# Altium PCB STM32H743I-EVAL2PCBDESIGN.PcbDoc (part 6 of 23)
Units mil, origin at the board's own origin, x right, y up, seen from the top; angles counter-clockwise.
Board outline 6558 x 5417 mil, 8 copper layers (L1_TOP, L2_GND, L3_HS1, L4_POWER, L5_SIG, L6_HS2, L7_GND, L8_BOTTOM), stack 61.368 mil thick; 620 components, 588 nets, 2945 pads, 1724 vias.
Unrouted connection lines stored in the file: 1.
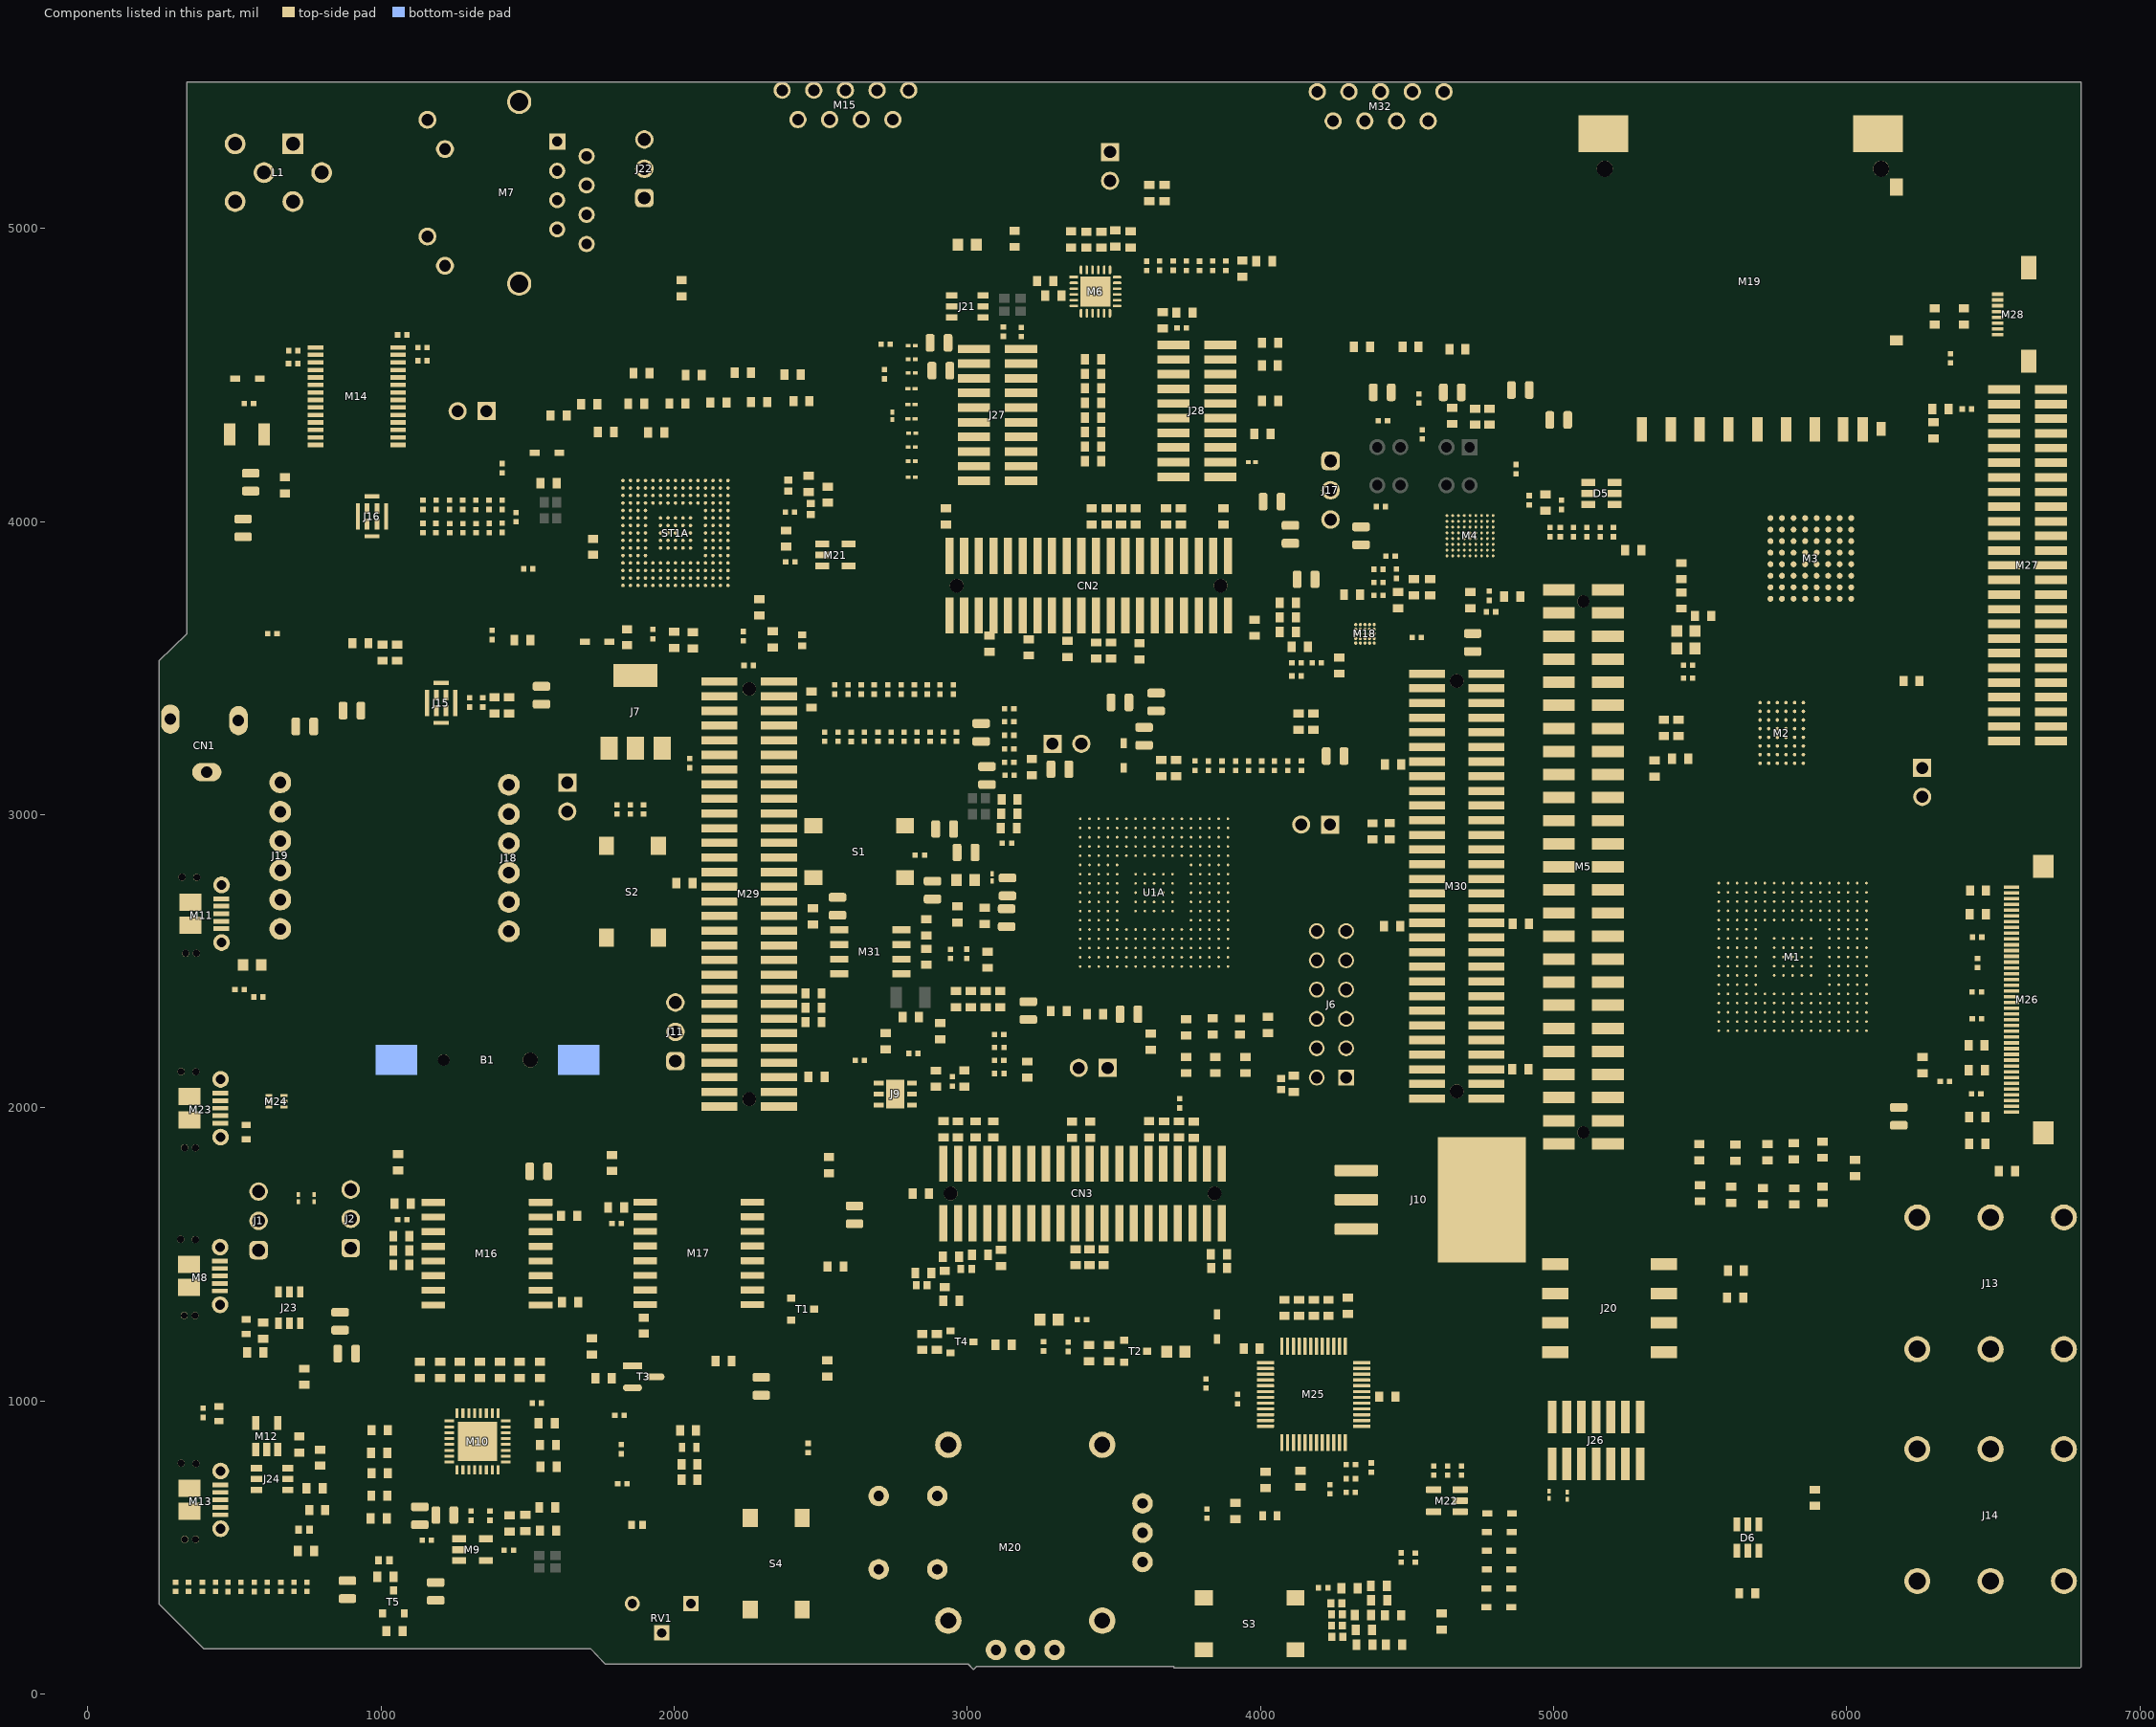
[diagram p8: the components of this part, seen from the top]

## Part data (continued)
M8 M11 M13: library part 105017-0001, "Conn Micro USB 2.0 Type B RCP 5 POS 0.65mm Solder RA SMD 5 Terminal 1 Port Micro-USB T/R", Contact Resistance=30mΩ, Current Rating=2.5A, Dielectric Material="Liquid Crystal Polymer", Insulation Color=Black, Insulation Resistance=1GΩ, Manufacturer=Molex, Manufacturer Lifecycle Status=ACTIVE, Max Operating Temperature=85°C, Max Voltage Rating (AC)=30V, Min Operating Temperature=-30°C, Supplier Part Number=WM1399CT-ND, Category="USB Connectors", China RoHS=Compliant, ComponentLink1Description=https://datasheet.octopart.com:443/1050170001-Molex-datasheet-142335147.pdf?src-supplier=IHS, ComponentLink1URL=https://datasheet.octopart.com:443/1050170001-Molex-datasheet-142335147.pdf?src-supplier=IHS, ComponentLink2Description=https://datasheet.octopart.com:443/105017-0001-Molex-datasheet-14876665.pdf?src-supplier=Upverter, ComponentLink2URL=https://datasheet.octopart.com:443/105017-0001-Molex-datasheet-14876665.pdf?src-supplier=Upverter, ComponentLink3Description=https://datasheet.octopart.com:443/105017-0001-Molex-datasheet-10100431.pdf?src-supplier=Upverter, ComponentLink3URL=https://datasheet.octopart.com:443/105017-0001-Molex-datasheet-10100431.pdf?src-supplier=Upverter, ComponentLink4Description=https://datasheet.octopart.com:443/1050170001-Molex-datasheet-8355809.pdf?src-supplier=Upverter, ComponentLink4URL=https://datasheet.octopart.com:443/1050170001-Molex-datasheet-8355809.pdf?src-supplier=Upverter, ComponentLink5Description=https://sigma.octopart.com:443/120074112/technical_drawing/Molex-1050170001.pdf?src-supplier=Upverter, ComponentLink5URL=https://sigma.octopart.com:443/120074112/technical_drawing/Molex-1050170001.pdf?src-supplier=Upverter, ComponentLink6Description=https://datasheet.octopart.com:443/105017-0001-Molex-datasheet-13746511.pdf?src-supplier=Sager+Electronics, ComponentLink6URL=https://datasheet.octopart.com:443/105017-0001-Molex-datasheet-13746511.pdf?src-supplier=Sager+Electronics, ComponentLink7Description=https://datasheet.octopart.com:443/105017-0001-Molex-datasheet-193058816.pdf?src-supplier=JRH+Electronics, ComponentLink7URL=https://datasheet.octopart.com:443/105017-0001-Molex-datasheet-193058816.pdf?src-supplier=JRH+Electronics, ComponentLink8Description=https://datasheet.octopart.com:443/105017-0001-Molex-datasheet-154742999.pdf?src-supplier=Master+Electronics, ComponentLink8URL=https://datasheet.octopart.com:443/105017-0001-Molex-datasheet-154742999.pdf?src-supplier=Master+Electronics, ComponentLink9Description=https://datasheet.octopart.com:443/105017-0001-Molex-datasheet-77519180.pdf?src-supplier=Newark, ComponentLink9URL=https://datasheet.octopart.com:443/105017-0001-Molex-datasheet-77519180.pdf?src-supplier=Newark, ComponentLink10Description=https://datasheet.octopart.com:443/105017-0001-Molex-datasheet-66628043.pdf?src-supplier=Newark, ComponentLink10URL=https://datasheet.octopart.com:443/105017-0001-Molex-datasheet-66628043.pdf?src-supplier=Newark, ComponentLink11Description=https://datasheet.octopart.com:443/105017-0001-Molex-datasheet-32867472.pdf?src-supplier=Farnell, ComponentLink11URL=https://datasheet.octopart.com:443/105017-0001-Molex-datasheet-32867472.pdf?src-supplier=Farnell, ComponentLink12Description=https://datasheet.octopart.com:443/105017-0001-Molex-datasheet-24907595.pdf?src-supplier=Farnell, ComponentLink12URL=https://datasheet.octopart.com:443/105017-0001-Molex-datasheet-24907595.pdf?src-supplier=Farnell, ComponentLink13Description=https://datasheet.octopart.com:443/105017-0001-Molex-datasheet-140174740.pdf?src-supplier=RS+(Formerly+Allied+Electronics), ComponentLink13URL=https://datasheet.octopart.com:443/105017-0001-Molex-datasheet-140174740.pdf?src-supplier=RS+(Formerly+Allied+Electronics), ComponentLink14Description=https://datasheet.octopart.com:443/105017-0001-Molex-datasheet-120135174.pdf?src-supplier=RS+(Formerly+Allied+Electronics), ComponentLink14URL=https://datasheet.octopart.com:443/105017-0001-Molex-datasheet-120135174.pdf?src-supplier=RS+(Formerly+Allied+Electronics), ComponentLink15Description=https://datasheet.octopart.com:443/1050170001-Molex-datasheet-137316104.pdf?src-supplier=Future+Electronics, ComponentLink15URL=https://datasheet.octopart.com:443/1050170001-Molex-datasheet-137316104.pdf?src-supplier=Future+Electronics, ComponentLink16Description=https://datasheet.octopart.com:443/105017-0001-Molex-datasheet-44399914.pdf?src-supplier=Electro+Sonic, ComponentLink16URL=https://datasheet.octopart.com:443/105017-0001-Molex-datasheet-44399914.pdf?src-supplier=Electro+Sonic, ComponentLink17Description=https://datasheet.octopart.com:443/105017-0001-Molex-datasheet-41578275.pdf?src-supplier=Electro+Sonic, ComponentLink17URL=https://datasheet.octopart.com:443/105017-0001-Molex-datasheet-41578275.pdf?src-supplier=Electro+Sonic, ComponentLink18Description=https://datasheet.octopart.com:443/105017-0001-Molex-datasheet-23708332.pdf?src-supplier=Electro+Sonic, ComponentLink18URL=https://datasheet.octopart.com:443/105017-0001-Molex-datasheet-23708332.pdf?src-supplier=Electro+Sonic, ComponentLink19Description=http://sigma.octopart.com:80/16324173/rohs_statement/Molex-105017-0001.pdf?src-supplier=Compliance+Statements, ComponentLink19URL=http://sigma.octopart.com:80/16324173/rohs_statement/Molex-105017-0001.pdf?src-supplier=Compliance+Statements, ComponentLink20Description=http://sigma.octopart.com:80/reach_statement/Molex-company-74.pdf?src-supplier=Compliance+Statements, ComponentLink20URL=http://sigma.octopart.com:80/reach_statement/Molex-company-74.pdf?src-supplier=Compliance+Statements, ComponentLink21Description=http://sigma.octopart.com:80/rohs_statement/Molex-company-73.pdf?src-supplier=Compliance+Statements, ComponentLink21URL=http://sigma.octopart.com:80/rohs_statement/Molex-company-73.pdf?src-supplier=Compliance+Statements, ComponentLink22Description=http://sigma.octopart.com:80/conflict_mineral_statement/Molex-company-72.pdf?src-supplier=Compliance+Statements, ComponentLink22URL=http://sigma.octopart.com:80/conflict_mineral_statement/Molex-company-72.pdf?src-supplier=Compliance+Statements, Connector Type="Receptacle, USB", Contact Material=Brass, Contact Plating=Gold, Country of Origin=US, Depth=7.5mm, Export Control Classification Number (ECCN) Code=EAR99, Features=Shielded, Gender=Female, Halogen Free="Low Halogen", Harmonized Tariff Schedule (HTS) Code=8536.69.40.30, Height=2.825mm, Housing Material=Polymer, Introduction Date=2009-06-22, Length=8.2mm, Lifecycle Status=Production, Manufacturer Part Number=105017-0001, Mounting Technology=Cable, Number of Circuits=5, Number of Contacts=5, Number of Ports=1, Number of Positions=5, Number of Rows=1, Number of Terminals=5, Orientation="Right Angle", Pins=5, Pitch=650µm, Plating=Gold, Pricing="1=0.92, 10=0.785, 25=0.7356, 50=0.7004, 100=0.667, 250=0.62516, 500=0.59532, 1000=0.56688 (USD)", Radiation Hardening=No, REACH SVHC=Yes, RoHS=Compliant, Schedule B="8536695050, 8536695050|8536695050, 8536695050|8536695050|8536695050, 8536695050|8536695050|8536695050|8536695050", Shell Finish=Tin, Shell Material="Stainless Steel", Stock=55178, Supplier=DigiKey, Terminal Pitch=650µm, Termination=Solder, USB Standard="USB 2.0", Voltage Rating=30V, Voltage Rating (AC)=30V
M9 M12 M21: "STMPS Series 1 Channel 5.5V 500 mA 200 mOhm High Side Power Switch - SOT-23-5", Ambient Temperature Range High=85°C, Case/Package=LSSOP, Current=500mA, Drain to Source Resistance=90mΩ, Manufacturer=STMicroelectronics, Max Junction Temperature (Tj)=125°C, Max Power Dissipation=33.8mW, Max Supply Current=40µA, Max Supply Voltage=5.5V, Min Input Voltage=2.7V, Min Operating Temperature=-40°C, Nominal Supply Current=12µA, Nominal Supply Voltage=5V, Power Dissipation=32.5mW, Supplier Part Number=497-6934-1-ND, Category="Power Switch ICs - Power Distribution", China RoHS=Compliant, ComponentLink1Description=https://datasheet.octopart.com:443/STMPS2151STR-STMicroelectronics-datasheet-15207125.pdf?src-supplier=ODG+(Origin+Data+Global), ComponentLink1URL=https://datasheet.octopart.com:443/STMPS2151STR-STMicroelectronics-datasheet-15207125.pdf?src-supplier=ODG+(Origin+Data+Global), ComponentLink2Description=https://datasheet.octopart.com:443/STMPS2151STR-STMicroelectronics-datasheet-8090930.pdf?src-supplier=Factory+Futures, ComponentLink2URL=https://datasheet.octopart.com:443/STMPS2151STR-STMicroelectronics-datasheet-8090930.pdf?src-supplier=Factory+Futures, ComponentLink3Description=https://datasheet.octopart.com:443/STMPS2151STR-STMicroelectronics-datasheet-12510524.pdf?src-supplier=Factory+Futures, ComponentLink3URL=https://datasheet.octopart.com:443/STMPS2151STR-STMicroelectronics-datasheet-12510524.pdf?src-supplier=Factory+Futures, ComponentLink4Description=https://datasheet.octopart.com:443/STMPS2151STR-STMicroelectronics-datasheet-502421.pdf?src-supplier=Future+Electronics, ComponentLink4URL=https://datasheet.octopart.com:443/STMPS2151STR-STMicroelectronics-datasheet-502421.pdf?src-supplier=Future+Electronics, Country of Origin=Malaysia, Current Rating=500mA, Export Control Classification Number (ECCN) Code=EAR99, Fault Protection="Over Temperature, Reverse Current", Harmonized Tariff Schedule (HTS) Code=8542.39.00.60, Height=1.45mm, Height - Seated (Max)=1.45mm, Introduction Date=2007-08-01, Lead Free="Lead Free", Length=2.9mm, Lifecycle Status=Production, Manufacturer Part Number=STMPS2151STR, Max Operating Temperature=85°C, Max Output current=500mA, Min Supply Voltage=2.7V, Mounting Technology="Surface Mount", Nominal Supply Voltage (DC)=5V, Number of Channels=1, Number of Circuits=1, Number of Inputs=1, Number of Outputs=1, Number of Terminals=5, On-State Resistance=90mΩ, Operating Supply Voltage=5.5V, Output Configuration="High Side", Output Current=500mA, Output Voltage=5V, Pins=5, Pricing="1=0.73, 10=0.517, 25=0.464, 100=0.406, 250=0.37836, 500=0.36168, 1000=0.34794 (USD)", Radiation Hardening=No, REACH SVHC=Yes, RoHS=Compliant, Schedule B=8542390000, Supplier=DigiKey, Terminal Pitch=950µm, Turn-Off Delay Time=10ms, Turn-On Delay Time=5ms, Voltage=5.5V, Width=1.625mm
M10: "Microchip USB3320C-EZK; USB Transceiver; USB 2.0 at 480Mbit/s; 32-Pin QFN", Dual Supply Voltage=3.3V, Frequency=60MHz, Manufacturer=Microchip, Manufacturer Lifecycle Status=REL, Max Operating Temperature=85°C, Max Supply Voltage=2V, Min Operating Temperature=-40°C, Min Supply Voltage=1.6V, Nominal Supply Current=5.6mA, Supplier Part Number=USB3320C-EZK-ND, Category="USB Interface ICs", ComponentLink1Description=https://datasheet.octopart.com:443/USB3320C-EZK-Microchip-datasheet-78862040.pdf?src-supplier=Microchip, ComponentLink1URL=https://datasheet.octopart.com:443/USB3320C-EZK-Microchip-datasheet-78862040.pdf?src-supplier=Microchip, ComponentLink2Description=https://datasheet.octopart.com:443/USB3320C-EZK-Microchip-datasheet-179437581.pdf?src-supplier=Microchip, ComponentLink2URL=https://datasheet.octopart.com:443/USB3320C-EZK-Microchip-datasheet-179437581.pdf?src-supplier=Microchip, ComponentLink3Description=https://datasheet.octopart.com:443/USB3320C-EZK-Microchip-datasheet-175859481.pdf?src-supplier=Microchip, ComponentLink3URL=https://datasheet.octopart.com:443/USB3320C-EZK-Microchip-datasheet-175859481.pdf?src-supplier=Microchip, ComponentLink4Description=https://datasheet.octopart.com:443/USB3320C-EZK-Microchip-datasheet-11971509.pdf?src-supplier=Arrow+Electronics, ComponentLink4URL=https://datasheet.octopart.com:443/USB3320C-EZK-Microchip-datasheet-11971509.pdf?src-supplier=Arrow+Electronics, ComponentLink5Description=https://datasheet.octopart.com:443/USB3320C-EZK-Microchip-datasheet-44328528.pdf?src-supplier=element14+APAC, ComponentLink5URL=https://datasheet.octopart.com:443/USB3320C-EZK-Microchip-datasheet-44328528.pdf?src-supplier=element14+APAC, ComponentLink6Description=https://datasheet.octopart.com:443/USB3320C-EZK-Microchip-datasheet-62308171.pdf?src-supplier=RS+(Formerly+Allied+Electronics), ComponentLink6URL=https://datasheet.octopart.com:443/USB3320C-EZK-Microchip-datasheet-62308171.pdf?src-supplier=RS+(Formerly+Allied+Electronics), ComponentLink7Description=http://sigma.octopart.com:80/188451864/materials_sheet/Microchip-USB3320C-EZK.pdf?src-supplier=Compliance+Statements, ComponentLink7URL=http://sigma.octopart.com:80/188451864/materials_sheet/Microchip-USB3320C-EZK.pdf?src-supplier=Compliance+Statements, ComponentLink8Description=http://sigma.octopart.com:80/rohs_statement/Microchip-company-71.pdf?src-supplier=Compliance+Statements, ComponentLink8URL=http://sigma.octopart.com:80/rohs_statement/Microchip-company-71.pdf?src-supplier=Compliance+Statements, ComponentLink9Description=http://sigma.octopart.com:80/reach_statement/Microchip-company-70.pdf?src-supplier=Compliance+Statements, ComponentLink9URL=http://sigma.octopart.com:80/reach_statement/Microchip-company-70.pdf?src-supplier=Compliance+Statements, ComponentLink10Description=http://sigma.octopart.com:80/conflict_mineral_statement/Microchip-company-69.pdf?src-supplier=Compliance+Statements, ComponentLink10URL=http://sigma.octopart.com:80/conflict_mineral_statement/Microchip-company-69.pdf?src-supplier=Compliance+Statements, ComponentLink11Description=http://sigma.octopart.com:80/conflict_mineral_statement/Microchip-company-68.pdf?src-supplier=Compliance+Statements, ComponentLink11URL=http://sigma.octopart.com:80/conflict_mineral_statement/Microchip-company-68.pdf?src-supplier=Compliance+Statements, Country of Assembly="Singapore, Taiwan", Country of Fabrication="United States of America", Country of Origin="Singapore, Taiwan", Data Rate=480Mbps, ESD Protection=Yes, Export Control Classification Number (ECCN) Code=EAR99, Harmonized Tariff Schedule (HTS) Code=8542.31.0030, Height=900µm, HS Code=8542.39.0090, Lead Free="Lead Free", Length=5mm, Lifecycle Status=Production, Manufacturer Part Number=USB3320C-EZK, Mounting Technology="Surface Mount", Number of Ports=1, Number of Transceivers=1, Operating Supply Current=5.6mA, Operating Supply Voltage=3.3V, Packaging="Cut Tape", Pins=32, Pricing="1=2.17, 25=1.8, 100=1.65 (USD)", Projected EOL Date=2034-06-12, Radiation Hardening=No, REACH SVHC=No, RoHS=Compliant, Schedule B="8542310000, 8542310000|8542310000|8542310000|8542310000|8542310000", Stock=28177, Supplier=DigiKey, Width=5mm
M14: "3 to 5.5V 400KBPS, RS-232 Transceiver With Auto-powerdown, [-40OC, 85OC] Temperature Range", Case/Package=SSOP, Dual Supply Voltage=5.5V, Low Level Output Current=1.6mA, Manufacturer=STMicroelectronics, Max Operating Temperature=85°C, Max Supply Current=1mA, Min Operating Temperature=-40°C, Min Supply Voltage=3V, Nominal Supply Voltage (DC)=3.3V, Supplier Part Number=497-6997-6-ND, Temperature Grade=Industrial, Category="Interface ICs", China RoHS=Compliant, ComponentLink1Description=https://datasheet.octopart.com:443/ST3241EBPR-STMicroelectronics-datasheet-10836365.pdf?src-supplier=Factory+Futures, ComponentLink1URL=https://datasheet.octopart.com:443/ST3241EBPR-STMicroelectronics-datasheet-10836365.pdf?src-supplier=Factory+Futures, ComponentLink2Description=https://datasheet.octopart.com:443/ST3241EBPR-STMicroelectronics-datasheet-23757367.pdf?src-supplier=STMicroelectronics, ComponentLink2URL=https://datasheet.octopart.com:443/ST3241EBPR-STMicroelectronics-datasheet-23757367.pdf?src-supplier=STMicroelectronics, ComponentLink3Description=https://datasheet.octopart.com:443/ST3241EBPR-STMicroelectronics-datasheet-112248627.pdf?src-supplier=SHENGYU+ELECTRONICS, ComponentLink3URL=https://datasheet.octopart.com:443/ST3241EBPR-STMicroelectronics-datasheet-112248627.pdf?src-supplier=SHENGYU+ELECTRONICS, ComponentLink4Description=https://datasheet.octopart.com:443/ST3241EBPR-STMicroelectronics-datasheet-14128491.pdf?src-supplier=iiiC, ComponentLink4URL=https://datasheet.octopart.com:443/ST3241EBPR-STMicroelectronics-datasheet-14128491.pdf?src-supplier=iiiC, ComponentLink5Description=https://datasheet.octopart.com:443/ST3241EBPR-STMicroelectronics-datasheet-558575.pdf?src-supplier=Future+Electronics, ComponentLink5URL=https://datasheet.octopart.com:443/ST3241EBPR-STMicroelectronics-datasheet-558575.pdf?src-supplier=Future+Electronics, ComponentLink6Description=https://datasheet.octopart.com:443/ST3241EBPR-STMicroelectronics-datasheet-29427.pdf?src-supplier=Mouser, ComponentLink6URL=https://datasheet.octopart.com:443/ST3241EBPR-STMicroelectronics-datasheet-29427.pdf?src-supplier=Mouser, Country of Origin=Philippines, Data Rate=250kbps, Export Control Classification Number (ECCN) Code=EAR99, Harmonized Tariff Schedule (HTS) Code=8542.39.00.60, Height=1.85mm, Height - Seated (Max)=2mm, Interface=RS-232, Introduction Date=1980-01-04, Lead Free="Lead Free", Length=10.2mm, Lifecycle Status=Production, Logic Function=Receiver, Manufacturer Part Number=ST3241EBPR, Max Supply Voltage=5.5V, Mounting Technology="Surface Mount", Nominal Supply Current=1mA, Number of Circuits=3, Number of Drivers=3, Number of Receivers=5, Number of Terminals=28, Number of Transceivers=1, Number of Transmitters=3, Pins=28, Pricing="1=3.89, 10=2.935, 25=2.696, 100=2.4333, 250=2.30808, 500=2.29132 (USD)", Radiation Hardening=No, REACH SVHC=No, RoHS=Compliant, Schedule B="8542390000, 8542390000|8542390000|8542390000|8542390000|8542390000", Stock=315, Supplier=DigiKey, Terminal Pitch=650µm, Width=5.3mm
M15 M32: "D Subminiature Connector, 9 Contact(s), Female, 2.84 inch Pitch, Solder Terminal, #4-40 Unc-2b", Color=White, Current Rating=7.5A, Manufacturer=Molex, Manufacturer Lifecycle Status=ACTIVE, Max Operating Temperature=125°C, Min Operating Temperature=-55°C, Supplier Part Number=900-1731090181-ND, Category="D-Sub Connectors", China RoHS=Compliant, ComponentLink1Description=https://datasheet.octopart.com:443/1731090181-Molex-datasheet-147937146.pdf?src-supplier=IHS, ComponentLink1URL=https://datasheet.octopart.com:443/1731090181-Molex-datasheet-147937146.pdf?src-supplier=IHS, ComponentLink2Description=http://sigma.octopart.com:80/reach_statement/Molex-company-74.pdf?src-supplier=Compliance+Statements, ComponentLink2URL=http://sigma.octopart.com:80/reach_statement/Molex-company-74.pdf?src-supplier=Compliance+Statements, ComponentLink3Description=http://sigma.octopart.com:80/rohs_statement/Molex-company-73.pdf?src-supplier=Compliance+Statements, ComponentLink3URL=http://sigma.octopart.com:80/rohs_statement/Molex-company-73.pdf?src-supplier=Compliance+Statements, ComponentLink4Description=http://sigma.octopart.com:80/conflict_mineral_statement/Molex-company-72.pdf?src-supplier=Compliance+Statements, ComponentLink4URL=http://sigma.octopart.com:80/conflict_mineral_statement/Molex-company-72.pdf?src-supplier=Compliance+Statements, Connector Type=D-Sub, Contact Plating=Gold, Country of Origin=DE, Export Control Classification Number (ECCN) Code=EAR99, Gender=Female, Harmonized Tariff Schedule (HTS) Code=8536.69.40.30, Housing Material=Steel, Insulation Color=White, Introduction Date=2019-07-25, Lifecycle Status=Production, Manufacturer Part Number=173109-0181, Mounting Technology="Through Hole", Number of Circuits=9, Number of Positions=9, Number of Rows=2, Orientation="Right Angle", Packaging=Carton, Pins=9, Pitch=72.136mm, Pricing="1=9.9, 10=8.414, 25=7.8872, 50=7.5106, 100=7.1521, 250=6.70452, 500=6.38476, 1000=6.08037 (USD)", REACH SVHC=Unknown, RoHS=Compliant, Row Spacing=2.54mm, Shell Finish=Tin, Shell Material=Steel, Supplier=DigiKey, Terminal Pitch=2.74mm, Termination=Solder
M16: "SPIFLASHNORSLC128MX4SOIC, Tray, Flash IC; SPIFLASHNORSLC128MX4SOIC, Tray, Flash IC", Ambient Temperature Range High=85°C, Case/Package=SOP, Frequency=133MHz, Manufacturer=Micron, Max Supply Current=94mA, Max Supply Voltage=3.6V, Min Operating Temperature=-40°C, Min Supply Voltage=2.7V, Nominal Supply Voltage (DC)=3V, Supplier Part Number=557-1651-ND, Temperature Grade=Industrial, Access Time=6ns, Category=Flash, China RoHS=Compliant, ComponentLink1Description=https://datasheet.octopart.com:443/MT25QL512ABB8ESF-0SIT-Micron-datasheet-103814521.pdf?src-supplier=Farnell, ComponentLink1URL=https://datasheet.octopart.com:443/MT25QL512ABB8ESF-0SIT-Micron-datasheet-103814521.pdf?src-supplier=Farnell, ComponentLink2Description=https://sigma.octopart.com:443/129378302/technical_drawing/Micron-MT25QL512ABB8ESF-0SIT.pdf?src-supplier=Upverter, ComponentLink2URL=https://sigma.octopart.com:443/129378302/technical_drawing/Micron-MT25QL512ABB8ESF-0SIT.pdf?src-supplier=Upverter, ComponentLink3Description=https://datasheet.octopart.com:443/MT25QL512ABB8ESF-0SIT-Micron-datasheet-163656713.pdf?src-supplier=SHENGYU+ELECTRONICS, ComponentLink3URL=https://datasheet.octopart.com:443/MT25QL512ABB8ESF-0SIT-Micron-datasheet-163656713.pdf?src-supplier=SHENGYU+ELECTRONICS, Country of Origin="Mainland China, Taiwan", Density=512Mb, Export Control Classification Number (ECCN) Code=EAR99, Harmonized Tariff Schedule (HTS) Code=8542.32.00.51, Height=2.65mm, Height - Seated (Max)=2.65mm, Interface=SPI, Introduction Date=2015-06-04, Length=10.3mm, Lifecycle Status=Production, Manufacturer Part Number=MT25QL512ABB8ESF-0SIT, Max Operating Temperature=85°C, Memory Format=FLASH, Memory Size=64MB, Mounting Technology="Surface Mount", Number of Circuits=1, Number of Terminals=16, Operating Supply Voltage=3V, Page Size=256B, Pins=16, Pricing="1=44.89, 10=41.511, 25=40.1748, 50=39.1762, 100=38.1909, 250=36.9146 (USD)", REACH SVHC=Yes, RoHS=Compliant, Schedule B="8542320050, 8542320050|8542320050, 8542320050|8542320050|8542320050, 8542320050|8542320050|8542320050|8542320050", Stock=1400, Supplier=DigiKey, Terminal Pitch=1.27mm, Width=7.5mm
M17: "SPIFLASHNORSLC128MX4SOIC, Tray, Flash IC; SPIFLASHNORSLC128MX4SOIC, Tray, Flash IC", Ambient Temperature Range High=85°C, Case/Package=SOP, Frequency=133MHz, Manufacturer=Micron, Manufacturer Part Number=MT25QL512ABB8ESF-0SIT, Max Supply Current=94mA, Max Supply Voltage=3.6V, Min Operating Temperature=-40°C, Min Supply Voltage=2.7V, Nominal Supply Voltage (DC)=3V, Supplier Part Number=557-1651-ND, Temperature Grade=Industrial, Access Time=6ns, Category=Flash, China RoHS=Compliant, ComponentLink1Description=https://datasheet.octopart.com:443/MT25QL512ABB8ESF-0SIT-Micron-datasheet-103814521.pdf?src-supplier=Farnell, ComponentLink1URL=https://datasheet.octopart.com:443/MT25QL512ABB8ESF-0SIT-Micron-datasheet-103814521.pdf?src-supplier=Farnell, ComponentLink2Description=https://sigma.octopart.com:443/129378302/technical_drawing/Micron-MT25QL512ABB8ESF-0SIT.pdf?src-supplier=Upverter, ComponentLink2URL=https://sigma.octopart.com:443/129378302/technical_drawing/Micron-MT25QL512ABB8ESF-0SIT.pdf?src-supplier=Upverter, ComponentLink3Description=https://datasheet.octopart.com:443/MT25QL512ABB8ESF-0SIT-Micron-datasheet-163656713.pdf?src-supplier=SHENGYU+ELECTRONICS, ComponentLink3URL=https://datasheet.octopart.com:443/MT25QL512ABB8ESF-0SIT-Micron-datasheet-163656713.pdf?src-supplier=SHENGYU+ELECTRONICS, Country of Origin="Mainland China, Taiwan", Density=512Mb, Export Control Classification Number (ECCN) Code=EAR99, Harmonized Tariff Schedule (HTS) Code=8542.32.00.51, Height=2.65mm, Height - Seated (Max)=2.65mm, Interface=SPI, Introduction Date=2015-06-04, Length=10.3mm, Lifecycle Status=Production, Max Operating Temperature=85°C, Memory Format=FLASH, Memory Size=64MB, Mounting Technology="Surface Mount", Number of Circuits=1, Number of Terminals=16, Operating Supply Voltage=3V, Page Size=256B, Pins=16, Pricing="1=44.89, 10=41.511, 25=40.1748, 50=39.1762, 100=38.1909, 250=36.9146 (USD)", REACH SVHC=Yes, RoHS=Compliant, Schedule B="8542320050, 8542320050|8542320050, 8542320050|8542320050|8542320050, 8542320050|8542320050|8542320050|8542320050", Stock=1400, Supplier=DigiKey, Terminal Pitch=1.27mm, Width=7.5mm
M18: "IC INTFACE SPECIALIZED 25WLCSP"
M19: "SD CARD CONNECTOR EMBOSS ASSY Secure Digital (Sd) Card", Color=Black, Contact Current Rating=500mA, Dielectric Material="Liquid Crystal Polymer", Flammability Rating="UL94 V-0", Manufacturer="TE Connectivity", Manufacturer Lifecycle Status=ACTIVE, Max Operating Temperature=85°C, Min Operating Temperature=-25°C, Supplier Part Number=A118090CT-ND, Category="Card Edge Connectors", China RoHS=Compliant, Circuit Application=Signal, ComponentLink1Description=https://datasheet.octopart.com:443/1939870-1-TE-Connectivity-datasheet-179975926.pdf?src-supplier=Farnell, ComponentLink1URL=https://datasheet.octopart.com:443/1939870-1-TE-Connectivity-datasheet-179975926.pdf?src-supplier=Farnell, ComponentLink2Description=https://datasheet.octopart.com:443/1939870-1-TE-Connectivity-datasheet-179975927.pdf?src-supplier=Farnell, ComponentLink2URL=https://datasheet.octopart.com:443/1939870-1-TE-Connectivity-datasheet-179975927.pdf?src-supplier=Farnell, ComponentLink3Description=https://sigma.octopart.com:443/49791557/technical_drawing/TE-Connectivity-1939870-1.pdf?src-supplier=ODG+(Origin+Data+Global), ComponentLink3URL=https://sigma.octopart.com:443/49791557/technical_drawing/TE-Connectivity-1939870-1.pdf?src-supplier=ODG+(Origin+Data+Global), ComponentLink4Description=https://datasheet.octopart.com:443/1939870-1-TE-Connectivity---AMP-datasheet-193266114.pdf?src-supplier=JRH+Electronics, ComponentLink4URL=https://datasheet.octopart.com:443/1939870-1-TE-Connectivity---AMP-datasheet-193266114.pdf?src-supplier=JRH+Electronics, ComponentLink5Description=https://sigma.octopart.com:443/14898149/technical_drawing/TE-Connectivity-1939870-1.pdf?src-supplier=TE+Connectivity, ComponentLink5URL=https://sigma.octopart.com:443/14898149/technical_drawing/TE-Connectivity-1939870-1.pdf?src-supplier=TE+Connectivity, ComponentLink6Description=https://datasheet.octopart.com:443/1939870-1-TE-Connectivity---AMP-datasheet-154801044.pdf?src-supplier=Master+Electronics, ComponentLink6URL=https://datasheet.octopart.com:443/1939870-1-TE-Connectivity---AMP-datasheet-154801044.pdf?src-supplier=Master+Electronics, ComponentLink7Description=https://datasheet.octopart.com:443/1939870-1-TE-Connectivity-datasheet-166228420.pdf?src-supplier=RS+(Formerly+Allied+Electronics), ComponentLink7URL=https://datasheet.octopart.com:443/1939870-1-TE-Connectivity-datasheet-166228420.pdf?src-supplier=RS+(Formerly+Allied+Electronics), ComponentLink8Description=http://sigma.octopart.com:80/38577613/materials_sheet/TE-Connectivity-1939870-1.pdf?src-supplier=Compliance+Statements, ComponentLink8URL=http://sigma.octopart.com:80/38577613/materials_sheet/TE-Connectivity-1939870-1.pdf?src-supplier=Compliance+Statements, ComponentLink9Description=http://sigma.octopart.com:80/14898148/rohs_certificate/TE-Connectivity---AMP-1939870-1.pdf?src-supplier=Compliance+Statements, ComponentLink9URL=http://sigma.octopart.com:80/14898148/rohs_certificate/TE-Connectivity---AMP-1939870-1.pdf?src-supplier=Compliance+Statements, Contact Plating="Gold, Tin", Current Rating=500mA, ELV=Compliant, Export Control Classification Number (ECCN) Code=EAR99, Gender=Male, Harmonized Tariff Schedule (HTS) Code=8536.69.40.40, Housing Color=Black, Housing Material=Thermoplastic, Insulation Color=Black, Introduction Date=2009-06-29, Lifecycle Status=Production, LTB Date=2026-11-28, Manufacturer Part Number=1939870-1, Mounting Technology="Surface Mount", Number of Contacts=9, Number of Ports=1, Number of Positions=9, Number of Rows=1, Orientation="Right Angle", Packaging="Tape & Reel", Pins=9, Pitch=2.4mm, Plating Thickness=500nm, Pricing="1=5.36, 10=4.553, 25=4.2672, 50=4.0634 (USD)", Radiation Hardening=No, REACH SVHC=Yes, RoHS=Compliant, Shielding=Unshielded, Stock=7302, Supplier=DigiKey, Terminal Pitch=1.7mm, Termination=Solder, Underplate Material=Nickel
M20: "Switch Joystick Analog", Manufacturer=SparkFun, Supplier Part Number=1568-09032-ND, Category=Uncategorized, Manufacturer Part Number=09032, Pricing="1=5.25 (USD)", Stock=1640, Supplier=DigiKey
M22: "LD3985 Series 150 mA 3.3 V Fixed Low Noise LDO BiCMOS Regulator-SOT-23-5", Case/Package=LSSOP, Dropout Voltage=60mV, Input Bias Current=85µA, Manufacturer=STMicroelectronics, Max Junction Temperature (Tj)=125°C, Max Output current=150mA, Max Supply Voltage=6V, Min Current Limit=300mA, Min Input Voltage=2.5V, Min Operating Temperature=-40°C, Min Output Voltage=3.3V, Output Voltage Accuracy=2%, Quiescent Current=150µA, Supplier Part Number=497-3504-1-ND, Voltage Tolerance=3%, Accuracy=2%, Category="LDO Voltage Regulators", China RoHS=Compliant, ComponentLink1Description=https://datasheet.octopart.com:443/LD3985M33R-STMicroelectronics-datasheet-10835804.pdf?src-supplier=element14+APAC, ComponentLink1URL=https://datasheet.octopart.com:443/LD3985M33R-STMicroelectronics-datasheet-10835804.pdf?src-supplier=element14+APAC, ComponentLink2Description=https://datasheet.octopart.com:443/LD3985M33R-STMicroelectronics-datasheet-62333366.pdf?src-supplier=Augswan, ComponentLink2URL=https://datasheet.octopart.com:443/LD3985M33R-STMicroelectronics-datasheet-62333366.pdf?src-supplier=Augswan, ComponentLink3Description=https://datasheet.octopart.com:443/LD3985M33R-STMicroelectronics-datasheet-164563980.pdf?src-supplier=TME, ComponentLink3URL=https://datasheet.octopart.com:443/LD3985M33R-STMicroelectronics-datasheet-164563980.pdf?src-supplier=TME, ComponentLink4Description=https://datasheet.octopart.com:443/LD3985M33R-STMicroelectronics-datasheet-104525728.pdf?src-supplier=Future+Electronics, ComponentLink4URL=https://datasheet.octopart.com:443/LD3985M33R-STMicroelectronics-datasheet-104525728.pdf?src-supplier=Future+Electronics, ComponentLink5Description=https://datasheet.octopart.com:443/LD3985M33R-STMicroelectronics-datasheet-14170001.pdf?src-supplier=iiiC, ComponentLink5URL=https://datasheet.octopart.com:443/LD3985M33R-STMicroelectronics-datasheet-14170001.pdf?src-supplier=iiiC, ComponentLink6Description=https://datasheet.octopart.com:443/LD3985M33R-STMicroelectronics-datasheet-27122505.pdf?src-supplier=Components+Direct, ComponentLink6URL=https://datasheet.octopart.com:443/LD3985M33R-STMicroelectronics-datasheet-27122505.pdf?src-supplier=Components+Direct, ComponentLink7Description=https://datasheet.octopart.com:443/LD3985M33R-STMicroelectronics-datasheet-29224.pdf?src-supplier=DigiKey, ComponentLink7URL=https://datasheet.octopart.com:443/LD3985M33R-STMicroelectronics-datasheet-29224.pdf?src-supplier=DigiKey, Country of Origin="Mainland China", Export Control Classification Number (ECCN) Code=EAR99, Harmonized Tariff Schedule (HTS) Code=8542.39.00.60, Height=1.45mm, Height - Seated (Max)=1.45mm, Introduction Date=1980-01-04, Lead Free="Lead Free", Length=2.9mm, Lifecycle Status=Production, Manufacturer Part Number=LD3985M33R, Max Operating Temperature=125°C, Min Supply Voltage=2.5V, Mounting Technology="Surface Mount", Number of Channels=1, Number of Circuits=1, Number of Outputs=1, Number of Regulators=1, Number of Terminals=5, Output Current=150mA, Output Type=Fixed, Output Voltage=3.3V, Pins=5, Polarity=Positive, Pricing="1=0.78, 10=0.552, 25=0.4964, 100=0.435, 250=0.40568, 500=0.388, 1000=0.37345 (USD)", Radiation Hardening=No, REACH SVHC=Yes, RoHS=Compliant, Schedule B="8542390000, 8542390000|8542390000, 8542390000|8542390000|8542390000, 8542390000|8542390000|8542390000|8542390000", Stock=15691, Supplier=DigiKey, Terminal Pitch=950µm, Width=1.625mm
M23: "Conn Micro USB 2.0 Type B RCP 5 POS 0.65mm Solder RA SMD 5 Terminal 1 Port Micro-USB T/R", Contact Resistance=30mΩ, Current Rating=2.5A, Dielectric Material="Liquid Crystal Polymer", Insulation Color=Black, Insulation Resistance=1GΩ, Manufacturer=Molex, Manufacturer Lifecycle Status=ACTIVE, Manufacturer Part Number=105017-0001, Max Operating Temperature=85°C, Max Voltage Rating (AC)=30V, Min Operating Temperature=-30°C, Supplier Part Number=WM1399CT-ND, Category="USB Connectors", China RoHS=Compliant, ComponentLink1Description=https://datasheet.octopart.com:443/1050170001-Molex-datasheet-142335147.pdf?src-supplier=IHS, ComponentLink1URL=https://datasheet.octopart.com:443/1050170001-Molex-datasheet-142335147.pdf?src-supplier=IHS, ComponentLink2Description=https://datasheet.octopart.com:443/105017-0001-Molex-datasheet-14876665.pdf?src-supplier=Upverter, ComponentLink2URL=https://datasheet.octopart.com:443/105017-0001-Molex-datasheet-14876665.pdf?src-supplier=Upverter, ComponentLink3Description=https://datasheet.octopart.com:443/105017-0001-Molex-datasheet-10100431.pdf?src-supplier=Upverter, ComponentLink3URL=https://datasheet.octopart.com:443/105017-0001-Molex-datasheet-10100431.pdf?src-supplier=Upverter, ComponentLink4Description=https://datasheet.octopart.com:443/1050170001-Molex-datasheet-8355809.pdf?src-supplier=Upverter, ComponentLink4URL=https://datasheet.octopart.com:443/1050170001-Molex-datasheet-8355809.pdf?src-supplier=Upverter, ComponentLink5Description=https://sigma.octopart.com:443/120074112/technical_drawing/Molex-1050170001.pdf?src-supplier=Upverter, ComponentLink5URL=https://sigma.octopart.com:443/120074112/technical_drawing/Molex-1050170001.pdf?src-supplier=Upverter, ComponentLink6Description=https://datasheet.octopart.com:443/105017-0001-Molex-datasheet-13746511.pdf?src-supplier=Sager+Electronics, ComponentLink6URL=https://datasheet.octopart.com:443/105017-0001-Molex-datasheet-13746511.pdf?src-supplier=Sager+Electronics, ComponentLink7Description=https://datasheet.octopart.com:443/105017-0001-Molex-datasheet-193058816.pdf?src-supplier=JRH+Electronics, ComponentLink7URL=https://datasheet.octopart.com:443/105017-0001-Molex-datasheet-193058816.pdf?src-supplier=JRH+Electronics, ComponentLink8Description=https://datasheet.octopart.com:443/105017-0001-Molex-datasheet-154742999.pdf?src-supplier=Master+Electronics, ComponentLink8URL=https://datasheet.octopart.com:443/105017-0001-Molex-datasheet-154742999.pdf?src-supplier=Master+Electronics, ComponentLink9Description=https://datasheet.octopart.com:443/105017-0001-Molex-datasheet-77519180.pdf?src-supplier=Newark, ComponentLink9URL=https://datasheet.octopart.com:443/105017-0001-Molex-datasheet-77519180.pdf?src-supplier=Newark, ComponentLink10Description=https://datasheet.octopart.com:443/105017-0001-Molex-datasheet-66628043.pdf?src-supplier=Newark, ComponentLink10URL=https://datasheet.octopart.com:443/105017-0001-Molex-datasheet-66628043.pdf?src-supplier=Newark, ComponentLink11Description=https://datasheet.octopart.com:443/105017-0001-Molex-datasheet-32867472.pdf?src-supplier=Farnell, ComponentLink11URL=https://datasheet.octopart.com:443/105017-0001-Molex-datasheet-32867472.pdf?src-supplier=Farnell, ComponentLink12Description=https://datasheet.octopart.com:443/105017-0001-Molex-datasheet-24907595.pdf?src-supplier=Farnell, ComponentLink12URL=https://datasheet.octopart.com:443/105017-0001-Molex-datasheet-24907595.pdf?src-supplier=Farnell, ComponentLink13Description=https://datasheet.octopart.com:443/105017-0001-Molex-datasheet-140174740.pdf?src-supplier=RS+(Formerly+Allied+Electronics), ComponentLink13URL=https://datasheet.octopart.com:443/105017-0001-Molex-datasheet-140174740.pdf?src-supplier=RS+(Formerly+Allied+Electronics), ComponentLink14Description=https://datasheet.octopart.com:443/105017-0001-Molex-datasheet-120135174.pdf?src-supplier=RS+(Formerly+Allied+Electronics), ComponentLink14URL=https://datasheet.octopart.com:443/105017-0001-Molex-datasheet-120135174.pdf?src-supplier=RS+(Formerly+Allied+Electronics), ComponentLink15Description=https://datasheet.octopart.com:443/1050170001-Molex-datasheet-137316104.pdf?src-supplier=Future+Electronics, ComponentLink15URL=https://datasheet.octopart.com:443/1050170001-Molex-datasheet-137316104.pdf?src-supplier=Future+Electronics, ComponentLink16Description=https://datasheet.octopart.com:443/105017-0001-Molex-datasheet-44399914.pdf?src-supplier=Electro+Sonic, ComponentLink16URL=https://datasheet.octopart.com:443/105017-0001-Molex-datasheet-44399914.pdf?src-supplier=Electro+Sonic, ComponentLink17Description=https://datasheet.octopart.com:443/105017-0001-Molex-datasheet-41578275.pdf?src-supplier=Electro+Sonic, ComponentLink17URL=https://datasheet.octopart.com:443/105017-0001-Molex-datasheet-41578275.pdf?src-supplier=Electro+Sonic, ComponentLink18Description=https://datasheet.octopart.com:443/105017-0001-Molex-datasheet-23708332.pdf?src-supplier=Electro+Sonic, ComponentLink18URL=https://datasheet.octopart.com:443/105017-0001-Molex-datasheet-23708332.pdf?src-supplier=Electro+Sonic, ComponentLink19Description=http://sigma.octopart.com:80/16324173/rohs_statement/Molex-105017-0001.pdf?src-supplier=Compliance+Statements, ComponentLink19URL=http://sigma.octopart.com:80/16324173/rohs_statement/Molex-105017-0001.pdf?src-supplier=Compliance+Statements, ComponentLink20Description=http://sigma.octopart.com:80/reach_statement/Molex-company-74.pdf?src-supplier=Compliance+Statements, ComponentLink20URL=http://sigma.octopart.com:80/reach_statement/Molex-company-74.pdf?src-supplier=Compliance+Statements, ComponentLink21Description=http://sigma.octopart.com:80/rohs_statement/Molex-company-73.pdf?src-supplier=Compliance+Statements, ComponentLink21URL=http://sigma.octopart.com:80/rohs_statement/Molex-company-73.pdf?src-supplier=Compliance+Statements, ComponentLink22Description=http://sigma.octopart.com:80/conflict_mineral_statement/Molex-company-72.pdf?src-supplier=Compliance+Statements, ComponentLink22URL=http://sigma.octopart.com:80/conflict_mineral_statement/Molex-company-72.pdf?src-supplier=Compliance+Statements, Connector Type="Receptacle, USB", Contact Material=Brass, Contact Plating=Gold, Country of Origin=US, Depth=7.5mm, Export Control Classification Number (ECCN) Code=EAR99, Features=Shielded, Gender=Female, Halogen Free="Low Halogen", Harmonized Tariff Schedule (HTS) Code=8536.69.40.30, Height=2.825mm, Housing Material=Polymer, Introduction Date=2009-06-22, Length=8.2mm, Lifecycle Status=Production, Mounting Technology=Cable, Number of Circuits=5, Number of Contacts=5, Number of Ports=1, Number of Positions=5, Number of Rows=1, Number of Terminals=5, Orientation="Right Angle", Pins=5, Pitch=650µm, Plating=Gold, Pricing="1=0.92, 10=0.785, 25=0.7356, 50=0.7004, 100=0.667, 250=0.62516, 500=0.59532, 1000=0.56688 (USD)", Radiation Hardening=No, REACH SVHC=Yes, RoHS=Compliant, Schedule B="8536695050, 8536695050|8536695050, 8536695050|8536695050|8536695050, 8536695050|8536695050|8536695050|8536695050", Shell Finish=Tin, Shell Material="Stainless Steel", Stock=55176, Supplier=DigiKey, Terminal Pitch=650µm, Termination=Solder, USB Standard="USB 2.0", Voltage Rating=30V, Voltage Rating (AC)=30V
M24: "ECMF02 Series 200 mA 2.5 Ohm Common Mode Filter with ESD Protection - UQFN-6", Attenuation Value=-34dB, Case/Package=QFN, Current=200mA, DC Resistance (DCR)=2.5Ω, Manufacturer=STMicroelectronics, Max Junction Temperature (Tj)=125°C, Max Operating Temperature=85°C, Min Breakdown Voltage=6V, Min Operating Temperature=-40°C, Supplier Part Number=497-10773-2-ND, Approvals="IEC, UL", Bandwidth=6GHz, Category="EMI / RFI Filters", China RoHS=Compliant, ComponentLink1Description=https://datasheet.octopart.com:443/ECMF02-2AMX6-STMicroelectronics-datasheet-10838395.pdf?src-supplier=Factory+Futures, ComponentLink1URL=https://datasheet.octopart.com:443/ECMF02-2AMX6-STMicroelectronics-datasheet-10838395.pdf?src-supplier=Factory+Futures, ComponentLink2Description=https://datasheet.octopart.com:443/ECMF02-2AMX6-STMicroelectronics-datasheet-103922664.pdf?src-supplier=TME, ComponentLink2URL=https://datasheet.octopart.com:443/ECMF02-2AMX6-STMicroelectronics-datasheet-103922664.pdf?src-supplier=TME, Country of Origin="Mainland China", Current Rating=200mA, Depth=1.55mm, ESR=2.5Ω, Export Control Classification Number (ECCN) Code=EAR99, Harmonized Tariff Schedule (HTS) Code=8504.50.80.00, Height=550µm, Introduction Date=2010-08-11, Lead Free="Lead Free", Length=1.75mm, Lifecycle Status=Production, Manufacturer Part Number=ECMF02-2AMX6, Material=Plastic, Max Current Rating=200mA, Mounting Technology="Surface Mount", Number of Channels=2, Number of Circuits=2, Number of Lines=2, Number of Terminals=6, Packaging="Tape and Reel", Pins=6, Pricing="3000=0.21492, 6000=0.20267, 9000=0.19584, 15000=0.18757, 21000=0.18232, 30000=0.17692 (USD)", Radiation Hardening=No, REACH SVHC=Yes, RoHS=Compliant, Schedule B="8504500000, 8504500000|8504500000|8504500000|8504500000|8504500000|8504500000|8504500000|8504500000|8504500000|8504500000|8504500000|8504500000|8504500000|8504500000|8504500000|8504500000|8504500000|8504500000|8504500000|8504500000|8504500000|8504500000|8504500000|85", Stock=108512, Supplier=DigiKey, Termination=Flat, Width=1.55mm
M25: "Ultra-low-power ARM Cortex-M3 MCU with 256 Kbytes Flash, 32 MHz CPU, USB, 2xOp-amp", Case/Package=LFQFP, Clock Frequency=32MHz, Manufacturer=STMicroelectronics, Max Operating Temperature=85°C, Max Supply Current=12.3mA, Max Supply Voltage=3.6V, Min Operating Temperature=-40°C, Min Supply Voltage=1.8V, Nominal Supply Current=300nA, Nominal Supply Voltage (DC)=3V, Supplier Part Number=497-17533-ND, Temperature Grade=Industrial, ADC Channels (Resolution)="14-Ch 12-Bit", Category=Microcontrollers, China RoHS=Compliant, ComponentLink1Description=https://datasheet.octopart.com:443/STM32L152CCT6-STMicroelectronics-datasheet-104429913.pdf?src-supplier=IHS, ComponentLink1URL=https://datasheet.octopart.com:443/STM32L152CCT6-STMicroelectronics-datasheet-104429913.pdf?src-supplier=IHS, ComponentLink2Description=https://datasheet.octopart.com:443/STM32L152CCT6-STMicroelectronics-datasheet-13725669.pdf?src-supplier=Upverter, ComponentLink2URL=https://datasheet.octopart.com:443/STM32L152CCT6-STMicroelectronics-datasheet-13725669.pdf?src-supplier=Upverter, ComponentLink3Description=https://datasheet.octopart.com:443/STM32L152CCT6-STMicroelectronics-datasheet-62336827.pdf?src-supplier=SHENGYU+ELECTRONICS, ComponentLink3URL=https://datasheet.octopart.com:443/STM32L152CCT6-STMicroelectronics-datasheet-62336827.pdf?src-supplier=SHENGYU+ELECTRONICS, ComponentLink4Description=https://datasheet.octopart.com:443/STM32L152CCT6-STMicroelectronics-datasheet-48110666.pdf?src-supplier=element14+APAC, ComponentLink4URL=https://datasheet.octopart.com:443/STM32L152CCT6-STMicroelectronics-datasheet-48110666.pdf?src-supplier=element14+APAC, ComponentLink5Description=https://datasheet.octopart.com:443/STM32L152CCT6-STMicroelectronics-datasheet-16809526.pdf?src-supplier=element14+APAC, ComponentLink5URL=https://datasheet.octopart.com:443/STM32L152CCT6-STMicroelectronics-datasheet-16809526.pdf?src-supplier=element14+APAC, ComponentLink6Description=https://datasheet.octopart.com:443/STM32L152CCT6-STMicroelectronics-datasheet-27203481.pdf?src-supplier=element14+APAC, ComponentLink6URL=https://datasheet.octopart.com:443/STM32L152CCT6-STMicroelectronics-datasheet-27203481.pdf?src-supplier=element14+APAC, ComponentLink7Description=https://datasheet.octopart.com:443/STM32L152CCT6-STMicroelectronics-datasheet-34437481.pdf?src-supplier=Farnell, ComponentLink7URL=https://datasheet.octopart.com:443/STM32L152CCT6-STMicroelectronics-datasheet-34437481.pdf?src-supplier=Farnell, ComponentLink8Description=https://datasheet.octopart.com:443/STM32L152CCT6-STMicroelectronics-datasheet-21407672.pdf?src-supplier=Farnell, ComponentLink8URL=https://datasheet.octopart.com:443/STM32L152CCT6-STMicroelectronics-datasheet-21407672.pdf?src-supplier=Farnell, Core Architecture=ARM, DAC Channels (Resolution)="2-Ch 12-Bit (2)", Data Bus Width=32b, EEPROM Memory Size=8kB, Flash Memory Size=256kB, Frequency=32MHz, Height - Seated (Max)=1.6mm, Interface="IrDA, LIN, USB", Lead Free="Lead Free", Length=7mm, Lifecycle Status=Production, Manufacturer Part Number=STM32L152CCT6, Memory Format=FLASH, Memory Size=256kB, Number of Channels=14, Number of D/A Converters=2, Number of I2C Channels=2, Number of I/Os=37, Number of Programmable I/O=37, Number of SPI Channels=3, Number of Terminals=48, Number of Timers/Counters=1, Number of USART Channels=3, Oscillator Type=Internal, Peripherals="CRC, POR, RTC", Pins=48, Pricing="1=8.64, 10=6.679, 50=5.8916, 100=5.6478, 250=5.3904, 500=5.23526 (USD)", Radiation Hardening=No, RAM Size=32kB, REACH SVHC=Yes, RoHS=Compliant, Schedule B=8542310000, Stock=1289, Supplier=DigiKey, Terminal Pitch=500µm, Watchdog Timer=Yes, Width=7mm
M26: "Connector, Fpc, Receptacle, 40Pos, 1Row;", Contact Resistance=50mΩ, Current Rating=500mA, Flammability Rating="UL94 V-0", Insulation Resistance=500MΩ, Manufacturer="Wurth Elektronik", Manufacturer Lifecycle Status=ACTIVE, Max Operating Temperature=105°C, Min Operating Temperature=-40°C, Operating Supply Voltage=50V, Supplier Part Number=732-6012-1-ND, Actuator Material="Nylon, Polyamide", Category="FFC / FPC", ComponentLink1Description=https://datasheet.octopart.com:443/687140149022-Wurth-Elektronik-datasheet-168485085.pdf?src-supplier=Newark, ComponentLink1URL=https://datasheet.octopart.com:443/687140149022-Wurth-Elektronik-datasheet-168485085.pdf?src-supplier=Newark, ComponentLink2Description=https://datasheet.octopart.com:443/687140149022-W%C3%BCrth-Elektronik-datasheet-111088155.pdf?src-supplier=Wurth+Elektronik, ComponentLink2URL=https://datasheet.octopart.com:443/687140149022-W%C3%BCrth-Elektronik-datasheet-111088155.pdf?src-supplier=Wurth+Elektronik, ComponentLink3Description=https://datasheet.octopart.com:443/687140149022-W%C3%BCrth-Elektronik-datasheet-149525411.pdf?src-supplier=Farnell, ComponentLink3URL=https://datasheet.octopart.com:443/687140149022-W%C3%BCrth-Elektronik-datasheet-149525411.pdf?src-supplier=Farnell, ComponentLink4Description=https://datasheet.octopart.com:443/687140149022-W%C3%BCrth-Elektronik-datasheet-38737332.pdf?src-supplier=Farnell, ComponentLink4URL=https://datasheet.octopart.com:443/687140149022-W%C3%BCrth-Elektronik-datasheet-38737332.pdf?src-supplier=Farnell, ComponentLink5Description=https://datasheet.octopart.com:443/687140149022-W%C3%BCrth-Elektronik-datasheet-86508089.pdf?src-supplier=Farnell, ComponentLink5URL=https://datasheet.octopart.com:443/687140149022-W%C3%BCrth-Elektronik-datasheet-86508089.pdf?src-supplier=Farnell, ComponentLink6Description=https://datasheet.octopart.com:443/687140149022-W%C3%BCrth-Elektronik-datasheet-66581991.pdf?src-supplier=Farnell, ComponentLink6URL=https://datasheet.octopart.com:443/687140149022-W%C3%BCrth-Elektronik-datasheet-66581991.pdf?src-supplier=Farnell, Contact Material=Bronze, Contact Plating=Tin, Gender=Receptacle, Lead Pitch=500µm, Length=20.6mm, Lifecycle Status=Production, Manufacturer Part Number=687140149022, Mounting Technology="Surface Mount", Number of Contacts=40, Number of Positions=40, Number of Rows=1, Orientation=Horizontal, Packaging="Tape and Reel", Pins=40, Pitch=500µm, Pricing="1=2.38, 50=2.265, 100=2.103, 500=1.943, 1000=1.70001 (USD)", REACH SVHC=Unknown, RoHS=Compliant, Stock=5178, Supplier=DigiKey, Termination=Solder, Voltage Rating=50V, Wire/Cable Type=Straight, YEOL="1 = Estimated lifetime > 10 years"